# Altium PCB ZZ_KOM_ACB23_4009.PcbDoc (part 2 of 3)
Units mil, origin at the board's own origin, x right, y up, seen from the top; angles counter-clockwise.
Board outline 3937.01 x 2755.91 mil, 4 copper layers (Top Layer, Signal Layer 1, Signal Layer 2, Bottom Layer), stack 63.662 mil thick; 118 components, 212 nets, 909 pads, 347 vias.
Unrouted connection lines stored in the file: 40.
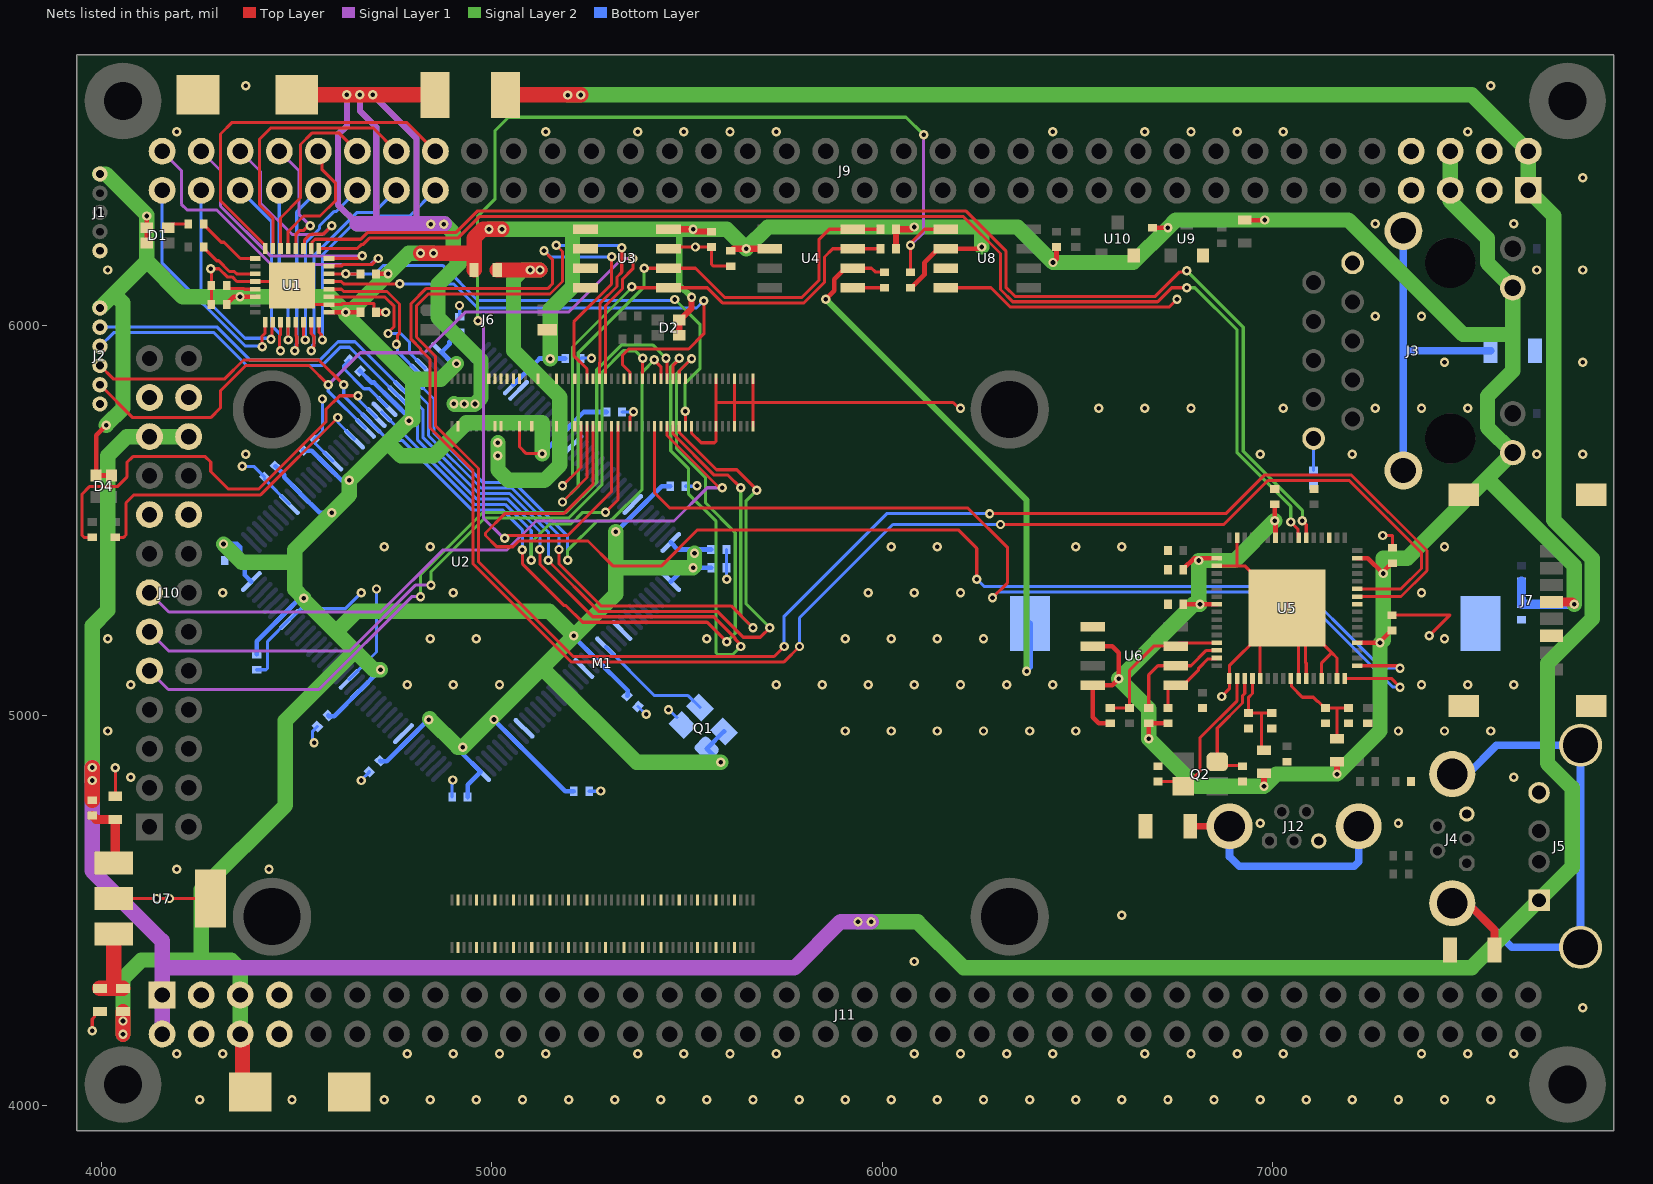
[diagram p4: the nets of this part, all layers, seen from the top]

## Via types
v1: diameter 24.02, hole 11.81, Top Layer to Bottom Layer, tented both sides, 347 vias

## Nets (pads, with @x,y where several pads share a name; then routed paths per layer and width w, separated by ;. In a path a pad name is that pad's centre, name@x,y a point inside that pad or via, vN(x,y) a via of type N, cw(c..) or ccw(c..) an arc to the next point about the centre after c; other vN are vias at no path point) (continued)
+3.3V: C2.2 C3.2 C4.2 C5.2 C6.2 C7.2 C9.2 C10.2 C11.2 C12.2 C14.2 C15.2 C16.2 C17.2 C19.2 C20.2 C21.2 C22.2 C28.2 C29.2 C30.2 C41.2 C42.2 C43.2 C44.2 C45.2 C50.1 D1.1 D1.2 D2.1 D2.2 D3.1 D4.1 D4.2 J1.1 J2.1 J3.11 J3.13 J7.4 J9.5 J9.6 J11.5 J11.6 L1.2 L2.2 L4.2 L5.2 M1.78 Q1.1 Q1.4 R1.2 R11.1 R12.1 R13.1 R14.1 R15.2 R16.2 R17.2 R24.2 R25.1 U1.9 U1.30 U2.7 U2.16 U2.30 U2.36 U2.37 U2.51 U2.66 U2.72 U2.79 U2.88 U2.102 U2.108 U2.118 U2.123 U2.135 U2.144 U3.8 U4.2 U5.20 U5.31 U5.42 U5.50 U5.56 U6.6 U6.8 U8.2 | length 20861
  Top Layer w7.87: M1.78@5070.87,5741.73 5070.87,5688.98 5088.6,5671.24 v1(5129.07,5671.24)
  Top Layer w11.81: v1(4011.81,5744.09) 3986.22,5718.5 D4.2@3986.22,5615.34 D4.1@4025.59,5615.34 ; D1.2@4116.14,6210.63 D1.1@4116.14,6250 v1(4116.14,6280) ; C2.2@4320.87,6053.15 4320.87,6055.12 4338.58,6072.83 v1(4355,6072.83) U1.30@4393.7,6072.83 ; U1.9@4582.68,6033.46 v1(4625.98,6033.46) C3.2@4663.78,6033.46 ; R1.2@4703.15,6131.89 v1(4734.25,6131.89) ; R14.1@6072.83,6096.26 6074.8,6096.26 6108.46,6129.92 6108.46,6160.83 6143.9,6196.26 U8.2@6163.39,6196.26 6247.68,6196.26 6252.21,6200.79 v1(6255.51,6200.79) ; v1(6437.91,6161.09) 6439.05,6161.09 6446.85,6168.89 R25.1@6446.85,6200.79 ; U6.6@6539.37,5177.95 6589.46,5177.95 6606.3,5161.12 v1(6606.3,5094.49) 6589.76,5077.95 U6.8@6539.37,5077.95 6539.37,4996.06 6555.12,4980.32 R17.2@6584.65,4980.32 ; v1(6683.07,4940.94) R16.2@6683.07,4980.32 R15.2@6732.28,4980.32 ; R24.2@6692.91,6250 v1(6732.28,6250) ; C44.2@6771.65,5285.43 v1(6814.47,5285.43) U5.56@6857.28,5285.43 ; C45.2@6771.65,5374.02 6771.65,5375.98 6799.21,5403.54 v1@6811.02,5403.54 ; v1(6811.02,5397.44) v1@6811.02,5403.54 ; U5.50@6857.28,5403.54 v1@6811.02,5403.54 ; D3.1@6929.13,6269.69 6979.69,6269.69 v1(6980,6270) ; v1(7005.91,5499.43) C41.2@7005.91,5541.34 ; U5.42@7007.87,5455.71 v1@7007.87,5499.51 ; U5.20@7217.52,5187.01 v1(7275.59,5187.01) 7275.59,5189.48 7304.32,5218.21 C43.2@7306.29,5218.21 ; U5.31@7217.52,5403.54 7244.09,5403.54 v1(7283.46,5364.17) 7285.8,5366.51 7285.8,5371.27 7305.31,5390.78 C42.2@7307.27,5390.78
  Top Layer w15.75: U3.8@5452.76,6246.26 v1(5515.65,6246.26) 5521.75,6240.16 C29.2@5562.99,6240.16 ; D2.1@5480.32,5974.41 D2.2@5480.32,6013.78 5482.28,6013.78 5511.81,6043.31 v1(5511.81,6071.55) ; C28.2@5612.2,6190.94 5614.17,6190.94 5619.49,6196.26 v1(5651.57,6196.26) U4.2@5712.6,6196.26 ; R13.1@6035.43,6196.26 R12.1@6035.43,6246.26 6074.73,6246.26 6080.44,6251.97 v1(6082.68,6251.97) ; v1(6978.35,4818.9) L2.2@6978.35,4852.36 ; v1(7165.35,4850.39) L1.2@7165.35,4881.89
  Top Layer w23.62: J7.4@7714.57,5291.34 7767.52,5291.34 7773.42,5285.43 v1(7773.53,5285.43)
  Top Layer w39.37: v1(4055.12,4184.25) L4.2@4055.12,4242.13 ; J11.6@4355.51,4184.25 4361.16,4178.6 4361.16,4055.37 C50.1@4381.1,4035.43 ; v1(4817.3,6185.04) 4952.15,6185.04 4954.72,6182.46 ; L5.2@4954.72,6141.73 4954.72,6182.46 ; v1(5026.17,6246.26) 4977.79,6246.26 4954.72,6223.2 4954.72,6182.46
  Signal Layer 2 w15.75: 5480.31,6246.26 5480.31,6103.05 v1(5511.81,6071.55)
  Signal Layer 2 w39.37: J2.1@3996.06,6044.61 4032.06,6080.61 ; J1.1@3996.06,6387.8 4011.01,6387.8 4116.14,6282.67 v1(4116.14,6280) 4116.14,6164.69 ; v1(4011.81,5744.09) 4055.12,5787.4 4055.12,6057.56 4032.06,6080.61 ; v1(4055.12,4184.25) 4055.12,4326.77 4102.36,4374.02 4255.51,4374.02 ; v1(4312.72,5439.87) 4359.7,5392.89 4495.33,5392.89 ; J11.6@4355.51,4184.25 J11.5@4355.51,4284.25 4355.51,4350.95 4332.45,4374.02 4255.51,4374.02 ; v1@4516.7,5299.3 4601.04,5214.96 ; v1(4518.16,5300.77) 4495.33,5323.6 4495.33,5392.89 ; v1(4714.95,5117.54) 4698.46,5117.54 4649.75,5166.25 ; v1(4787.98,5755.43) 4790.03,5757.5 4797.14,5757.5 4797.14,5856.92 4792.58,5861.48 ; v1(4787.98,5755.43) 4760.4,5727.85 4732.8,5700.27 ; v1@4840.68,4991.81 4913.13,4919.36 v1(4926,4919.36) 5129.02,5122.38 ; v1(4850.71,6185.04) 4787.4,6185.04 v1(4734.25,6131.89) 4635.83,6033.46 v1(4625.98,6033.46) ; v1(4909.62,5902.09) 4869.02,5861.48 4792.58,5861.48 ; v1(4992.76,6246.26) v1(5026.17,6246.26) 5206.69,6246.26 ; v1(5129.07,5671.24) 5129.07,5750.04 4934.98,5750.04 4850.71,5665.77 4767.3,5665.77 4732.8,5700.27 ; v1(5149.44,5914.53) 5149.44,6041.18 5206.69,6098.43 5206.69,6246.26 ; v1(5317.72,5471.65) 5317.72,5378.99 ; v1(5519.31,5416.18) 5519.31,5382.65 v1(5515.65,5378.99) 5317.72,5378.99 ; v1(5586.14,4880.72) 5370.68,4880.72 5129.02,5122.38 ; v1(6255.51,6200.79) 6255.51,6251.97 ; v1(7005.91,5499.43) 6903.92,5397.44 v1(6811.02,5397.44) 6811.02,5288.88 v1(6814.47,5285.43) 6797.24,5285.43 v1(6606.3,5094.49) 6683.07,5017.72 v1(6683.07,4940.94) 6805.12,4818.9 v1(6978.35,4818.9) 7009.84,4850.39 v1(7165.35,4850.39) 7275.59,4960.63 7275.59,5185.04 7283.46,5192.91 v1(7283.46,5364.17) 7283.46,5403.54 7345.47,5403.54 7549.7,5607.78 ; J9.6@7455.51,6446.06 J9.5@7455.51,6346.06 7455.51,6318.49 7551,6223 7551,6160.04 7614.78,6096.26 J3.13@7615.75,6096.26 7615.75,5976.38 ; v1(7773.53,5285.43) 7773.53,5383.95 7549.7,5607.78 ; 4032.06,6080.61 4116.14,6164.69 ; 4116.14,6164.69 4208,6072.83 v1(4355,6072.83) 4586.61,6072.83 v1(4625.98,6033.46) ; 4255.51,4374.02 4255.51,4554.72 4471,4770.21 4471,4987.5 4649.75,5166.25 ; 4495.33,5392.89 4495.33,5425.29 v1(4589.57,5519.54) 4635.22,5565.18 v1(4635.22,5602.68) 4732.8,5700.27 ; 4601.04,5214.96 4653.35,5267.28 5147.42,5267.28 v1(5210.3,5204.4) v1@5210.66,5204.03 ; 4601.04,5214.96 4649.75,5166.25 ; v1(4625.98,6033.46) 4625.98,6028.08 4792.58,5861.48 ; 5129.02,5122.38 v1@5210.66,5204.03 ; 5206.69,6246.26 5480.31,6246.26 v1(5515.65,6246.26) 5601.57,6246.26 v1(5651.57,6196.26) 5707.28,6251.97 v1(6082.68,6251.97) 6255.51,6251.97 ; v1@5210.66,5204.03 5317.72,5311.08 5317.72,5378.99 ; 6255.51,6251.97 6347.03,6251.97 v1(6437.91,6161.09) 6643.37,6161.09 v1(6732.28,6250) 6752.28,6270 v1(6980,6270) 7194.57,6270 7488.19,5976.38 7615.75,5976.38 ; 7549.7,5607.78 J3.11@7615.75,5673.82 7551,5738.57 7551,5819 7615.75,5883.75 7615.75,5976.38
  Bottom Layer w11.81: v1(4312.72,5439.87) 4347.91,5439.87 4354.83,5432.95 C10.2@4354.83,5397.72 4354.83,5395.75 4358.77,5391.81 4360.35,5391.81 4367.27,5384.89 4367.27,5360.29 U2.108@4383.97,5343.59 ; C11.2@4397.89,5156.91 4397.89,5190.48 U2.102@4467.49,5260.07 4505.84,5298.43 4515.83,5298.43 v1(4518.16,5300.77) ; C17.2@4445.97,5638.77 4467.86,5616.88 4467.86,5610.47 U2.118@4509.24,5569.09 4558.8,5519.54 v1(4589.57,5519.54) ; C16.2@4517.16,5680.49 4518.55,5679.09 4538.43,5679.09 U2.123@4578.84,5638.68 4614.84,5602.68 v1(4635.22,5602.68) ; C12.2@4581.15,5000.38 4582.55,4998.99 4596.15,4998.99 U2.88@4662.36,5065.2 4714.7,5117.54 v1(4714.95,5117.54) v1@4715.2,5117.54 ; C9.2@4662.36,5883.06 4691.98,5853.43 4698.16,5853.43 U2.135@4745.88,5805.72 4785.64,5765.95 4785.64,5757.77 v1(4787.98,5755.43) ; C4.2@4713.81,4884.25 4715.2,4882.86 4730.56,4882.86 U2.79@4787.63,4939.93 4837.16,4989.45 v1(4838.31,4989.45) ; v1(4909.62,5902.09) 4907.29,5904.42 4897.72,5904.42 U2.144@4871.15,5930.99 4891.62,5951.46 4891.62,5957.91 4916.03,5982.31 C15.2@4918,5982.31 ; v1(4926,4919.36) 4926,4901.78 U2.72@4971.37,4856.41 4937.93,4822.97 C7.2@4937.93,4791.59 ; v1@5005.04,4989.45 5005.36,4989.45 U2.66@5054.89,4939.93 5188.56,4806.25 C6.2@5210.21,4806.25 ; U2.7@5054.89,5847.47 5122.37,5914.96 C22.2@5188.22,5914.96 ; v1(5129.07,5671.24) 5129.21,5671.24 U2.16@5180.16,5722.2 5235.84,5777.88 C14.2@5294.3,5777.88 ; v1(5210.3,5204.4) 5210.3,5202.1 U2.51@5263.68,5148.72 5347.98,5064.42 5347.98,5052.67 C5.2@5346.58,5051.28 ; v1@5319.36,5471.65 U2.30@5375.03,5527.33 5435.49,5587.78 C20.2@5457.11,5587.78 ; U2.37@5458.55,5343.59 5493.95,5378.99 v1(5515.65,5378.99) C21.2@5562.14,5378.99 ; U2.36@5458.55,5443.81 5476.79,5425.57 v1@5519.31,5425.57 ; v1(5519.31,5416.18) v1@5519.31,5425.57 ; C19.2@5561.83,5425.57 v1@5519.31,5425.57 ; v1(5586.14,4880.72) 5585.39,4880.72 5551.1,4915.01 Q1.1@5550.35,4915.01 Q1.4@5594.89,4959.55
  Bottom Layer w23.62: R11.1@7637.8,5344.49 C30.2@7637.8,5285.43 v1(7773.53,5285.43)
  other v1: 4055.12,4217.66 5005.58,4990.12
+3.3V_CM: L5.1 M1.84 M1.86 | length 968.4
  Top Layer w39.37: L5.1@5013.78,6141.73 v1(5123.53,6141.73)
  Signal Layer 2 w39.37: v1(5015.75,5699.18) v1(5015.75,5665.77) 5015.75,5629.92 5042.99,5602.68 5134.66,5602.68 5174.44,5642.46 5174.44,5816.11 5055.51,5935.04 5055.51,6118.5 5078.74,6141.73 v1(5123.53,6141.73)
  other v1: 5098.48,6141.73
+3.3V_PHY: C46.2 C47.2 L2.1 U5.4 | length 250
  Top Layer w7.87: U5.4@6948.82,5095.47 6948.82,5057.01 6938.98,5047.17 C46.2@6938.98,5006.61 6971.48,5006.61 ; L2.1@6978.35,4911.42 6971.48,4918.28 6971.48,5006.61 ; C47.2@6998.03,5006.61 6971.48,5006.61
+3.3V_PLL: C48.2 C49.2 L1.1 U5.9 | length 269.2
  Top Layer w7.87: U5.9@7047.24,5095.47 7049.21,5093.5 7049.21,5074.73 7076.77,5047.17 7104.7,5047.17 7115.14,5036.73 7116.82,5036.73 7133.86,5019.69 7164.37,5019.69 ; L1.1@7165.35,4940.94 7165.35,5018.7 7164.37,5019.69 ; C49.2@7194.88,5019.69 7164.37,5019.69
+5.0V: J5.1 J9.1 J9.2 J10.21 J10.22 J11.1 J11.2 L3.1 R20.2 | length 10467.2
  Top Layer w39.37: R20.2@3976.38,4783.46 v1(3976.38,4833.89) v1(3976.38,4867.3) ; L3.1@5035.43,6590.55 v1@5228.35,6590.55
  Signal Layer 1 w39.37: v1(3976.38,4867.3) 3976.38,4602.36 4155.51,4423.23 4155.51,4353.74 ; J11.2@4155.51,4184.25 J11.1@4155.51,4284.25 4155.51,4353.74 ; v1@5972.44,4472.44 5893.7,4472.44 5775,4353.74 4155.51,4353.74
  Signal Layer 2 w39.37: v1(3976.38,4833.89) 3976.38,5230.15 4015.75,5269.52 4015.75,5665.77 4064.94,5714.96 J10.21@4123.22,5714.96 J10.22@4223.22,5714.96 ; v1@5194.2,6590.55 5227.6,6590.55 7511.02,6590.55 7645.87,6455.71 7652.56,6455.71 7655.51,6458.66 J9.2@7655.51,6446.06 J9.1@7655.51,6346.06 7720.47,6281.1 7720.47,5501.17 7818.9,5402.75 7818.9,5248.03 7704.72,5133.86 7704.72,4877.95 7767.72,4814.96 7767.72,4611.82 J5.1@7683.07,4527.17 7510.23,4354.33 6208.66,4354.33 6091.12,4471.88 v1(5938.29,4471.88)
  other v1: 5971.7,4471.88 5194.2,6589.99 5227.6,6589.99
+5.0V_CM: C31.1 L3.2 M1.77 M1.79 M1.81 M1.83 M1.85 M1.87 | length 3578.8
  Top Layer w39.37: C31.1@4500.79,6590.55 v1(4695.45,6590.55) L3.2@4854.33,6590.55
  Signal Layer 1 w15.75: v1(4628.64,6590.55) 4628.64,6510.53 4605.81,6487.7 4605.81,6309.55 4655.51,6259.84 ; v1(4662.04,6590.55) 4662.04,6549.15 4703.83,6507.36 4703.83,6264.67 ; v1(4695.45,6590.55) 4807.09,6478.91 4807.09,6259.84
  Signal Layer 1 w39.37: 4655.51,6259.84 4807.09,6259.84 v1@4877.95,6259.84
  Signal Layer 2 w15.75: v1(4628.64,6590.55) 4628.64,6510.53 4605.81,6487.7 4605.81,6309.55 4655.51,6259.84 ; v1(4662.04,6590.55) 4662.04,6549.15 4703.83,6507.36 4703.83,6264.67 4708.66,6259.84 ; v1(4695.45,6590.55) 4807.09,6478.91 4807.09,6259.84
  Signal Layer 2 w39.37: 4655.51,6259.84 4708.66,6259.84 4807.09,6259.84 4843.8,6259.84 4878.51,6259.84 4901.57,6236.78 4901.57,6180.47 4919.64,6162.41 4862.2,6104.97 4862.2,6020.39 4972.44,5910.15 4972.44,5814.33 v1@4955.4,5797.29 ; v1(4903.03,5798.79) 4904.53,5797.29 4929.13,5797.29 4955.68,5797.29 v1(4956.94,5798.55)
  other v1: 4929.13,5798.55 4843.8,6259.28 4877.21,6259.28
+VCore: C1.2 U1.29 | length 77.9
  Top Layer w7.87: C1.2@4320.87,6102.36 4320.87,6100.69 4326.77,6094.78 4364.09,6094.78 4366.35,6092.52 U1.29@4393.7,6092.52
Board_Reset: M1.48 R14.2 U8.1 | length 3201.9
  Top Layer w7.87: v1(5033.33,5454.66) 5033.33,5457.03 5037.95,5461.64 5194.28,5461.64 5307.09,5574.44 M1.48@5307.09,5741.73 ; R14.2@6072.83,6135.63 v1(6072.83,6204.72) 6072.83,6210.63 6108.46,6246.26 U8.1@6163.39,6246.26
  Signal Layer 1 w7.87: v1(4964.76,6011.81) 4978.88,5997.69 4978.88,5506.06 5030.28,5454.66 v1(5033.33,5454.66) ; v1(6072.83,6204.72) 6106.3,6238.19 v1(6106.3,6488.19)
  Signal Layer 2 w7.87: v1@4956.94,6011.81 v1(4964.76,6011.81) 4963.14,6013.44 4963.14,6277.9 5007.87,6322.64 5007.87,6498.07 5042.99,6533.18 6061.31,6533.18 v1(6106.3,6488.19)
ClockFPGA: Q1.3 U2.49 | length 306.6
  Bottom Layer w8: U2.49@5291.52,5176.56 5416.79,5051.28 5503.16,5051.28 Q1.3@5533.64,5020.8
CM_GPIO00: J10.13 M1.30 | length 1841.2
  Top Layer w7.87: M1.30@5448.82,5741.73 5448.82,5717.79 5579.7,5586.9 5587.63,5586.9 v1(5590.71,5583.82)
  Signal Layer 1 w7.87: J10.13@4123.22,5314.96 4172.78,5265.4 4715.83,5265.4 4875.33,5424.9 5039.07,5424.9 5113.06,5498.89 5217.15,5498.89 5467.01,5498.89 5551.94,5583.82 v1(5590.71,5583.82)
CM_GPIO01: J10.11 M1.37 | length 1853.4
  Top Layer w7.87: M1.37@5385.83,5862.99 5385.83,5914.66 v1(5386.84,5915.68)
  Signal Layer 1 w7.87: J10.11@4123.22,5214.96 4173,5165.18 4635.23,5165.18 4804.28,5334.23 v1(4844.22,5334.23)
  Signal Layer 2 w7.87: v1(4844.22,5334.23) 4843.8,5334.65 4843.8,5368.01 4982.35,5506.56 5197.11,5506.56 5282.84,5592.29 5282.84,5880.61 5337.19,5934.96 5367.56,5934.96 v1(5386.84,5915.68)
CM_GPIO02: J10.9 M1.29 | length 1991.4
  Top Layer w7.87: J10.9@4123.22,5114.96 J10.9@4132.26,5105.93 ; v1(5446.2,5916.04) 5448.82,5913.42 M1.29@5448.82,5862.99
  Signal Layer 1 w7.87: J10.9@4123.22,5114.96 4171.26,5066.93 4556.6,5066.93 4794.64,5304.97 v1(4817.3,5304.97)
  Signal Layer 2 w7.87: v1(4817.3,5304.97) 4817.3,5361.13 4976.61,5520.43 5191.36,5520.43 5268.97,5598.04 5268.97,5886.36 5332.58,5949.97 5412.27,5949.97 v1(5446.2,5916.04)
CM_RX_FPGA: M1.28 U2.138 | length 1851.2
  Top Layer w7.87: v1(5172.22,5425.57) 5172.22,5388.89 5279.9,5281.21 5613.35,5281.21 v1(5669.29,5225.28) ; M1.28@5464.57,5741.73 5464.57,5721.66 5569.99,5616.24 5605.37,5616.24 v1(5637.8,5583.82)
  Signal Layer 2 w7.87: v1(5637.8,5583.82) 5637.8,5256.77 v1(5669.29,5225.28)
  Bottom Layer w7.87: U2.138@4787.63,5847.47 4837.93,5797.18 4837.93,5717.51 4972.2,5583.23 5051.48,5583.23 5172.22,5462.49 v1(5172.22,5425.57)
CM_RX_FTDI: M1.34 U5.16 | length 2580.3
  Top Layer w7.87: M1.34@5417.32,5741.73 5417.32,5570.67 5456.5,5531.5 6220.22,5531.5 6321.57,5430.15 6321.57,5340.68 v1(6282.73,5301.83) ; U5.16@7185.04,5095.47 7304.33,5095.47 v1(7326.77,5073.04)
  Bottom Layer w7.87: v1(6282.73,5301.83) 6297.92,5317.02 7064.87,5317.02 7228.35,5153.54 7308.84,5073.05 v1(7326.77,5073.04)
CM_TX_FPGA: M1.31 U2.139 | length 1354.2
  Top Layer w7.87: v1(5416.55,5911.39) 5416.55,5910.67 5433.03,5894.19 5433.03,5888.62 ; M1.31@5433.07,5862.99 5433.07,5888.58 ; 5433.03,5888.62 5433.07,5888.58
  Signal Layer 2 w7.87: v1(5194.43,5397.72) 5194.43,5423.43 5269.88,5498.89 5303.07,5498.89 5307.18,5503 5308.82,5503 5385.3,5579.48 5385.3,5880.14 v1(5416.55,5911.39)
  Bottom Layer w7.87: U2.139@4801.55,5861.39 4851.8,5811.15 4851.8,5723.26 4977.95,5597.11 5057.22,5597.11 5194.43,5459.9 v1(5194.43,5397.72)
CM_TX_FTDI: M1.54 U5.17 | length 3213.1
  Top Layer w7.87: M1.54@5259.84,5741.73 5259.84,5593.34 5184.12,5517.62 5033.33,5517.62 4983.87,5468.16 4983.87,5461.64 5012.8,5432.72 5054.51,5432.72 5069.3,5447.51 5246.37,5447.51 5310.03,5383.86 5435.04,5383.86 5527.18,5476 6195.11,5476 6242.5,5428.61 v1(6242.5,5349.73) ; U5.17@7217.52,5127.95 7320.47,5127.95 v1(7326.77,5121.65)
  Bottom Layer w7.87: v1(6242.5,5349.73) 6261.34,5330.9 7070.61,5330.9 7234.09,5167.42 7279.86,5121.65 v1(7326.77,5121.65)
Con_RX_FTDI: M1.51 U5.26 | length 4855.6
  Top Layer w7.87: v1(5165.35,6204.72) 5181.1,6188.98 5181.1,6112.2 5149.01,6080.11 4836.93,6080.11 4807.19,6050.38 4807.19,5969.7 4855.51,5921.38 4855.51,5743.54 4966.02,5633.03 4966.02,5394.35 5208.7,5151.67 5723.42,5151.67 v1(5748.92,5177.17) ; M1.51@5275.59,5862.99 5275.59,5903.53 5277.4,5905.34 5277.4,6056.33 5320.77,6099.7 5320.77,6124.03 5332.98,6136.24 v1(5332.98,6198.82) ; v1(6275.29,5517.62) 6880.62,5517.62 6979.24,5616.24 7202.6,5616.24 7395.76,5423.07 7395.76,5371.42 7329.46,5305.12 U5.26@7217.52,5305.12
  Bottom Layer w7.87: v1(5165.35,6204.72) 5322.7,6204.72 5328.61,6198.82 v1(5332.98,6198.82) ; v1(5748.92,5177.17) 5748.92,5254.83 6011.72,5517.62 v1(6275.29,5517.62)
Con_TX_FTDI: M1.55 U5.27 | length 4827.4
  Top Layer w7.87: v1(5133.86,6190.94) 5155.25,6169.56 5155.25,6105.97 5143.26,6093.99 4831.18,6093.99 4793.31,6056.12 4793.31,5963.96 4817.3,5939.97 4817.3,5937.3 4841.64,5912.96 4841.64,5737.79 4952.15,5627.28 4952.15,5388.6 5202.96,5137.8 5748.92,5137.8 v1(5788.29,5177.17) ; M1.55@5244.09,5862.99 5244.09,5888.58 5210.3,5922.38 5210.3,6008.84 5306.9,6105.44 v1(5306.9,6175.29) ; v1(6303.23,5489.67) 6875.49,5489.67 6988.19,5602.36 7196.85,5602.36 7381.89,5417.32 7381.89,5377.17 7329.53,5324.8 U5.27@7217.52,5324.8
  Bottom Layer w7.87: v1(5133.86,6190.94) 5136.24,6190.94 5151.89,6175.29 v1(5306.9,6175.29) ; v1(5788.29,5177.17) 5788.29,5250.5 6027.46,5489.67 v1(6303.23,5489.67)
FPGA_LED_Green: R28.1 U2.128 | length 819.2
  Top Layer w7.87: R28.1@4035.43,5456.74 4056.76,5456.74 4062.83,5462.81 4062.83,5545.11 4083.56,5565.85 4407.7,5565.85 v1(4605.81,5763.96)
  Bottom Layer w7.87: v1(4605.81,5763.96) 4605.81,5750.91 U2.128@4648.44,5708.28
FPGA_LED_Red: R27.1 U2.132 | length 1144
  Top Layer w7.87: R27.1@3976.38,5456.74 3955.13,5456.74 3950.51,5461.35 3950.51,5568.1 3969.04,5586.62 4040.45,5586.62 4065,5611.17 4065,5648.38 4080.3,5663.68 4266.19,5663.68 4280,5649.88 4280,5625.38 4324.64,5580.74 4402.97,5580.74 4574.73,5752.5 4574.73,5784.25 4610.11,5819.64 v1(4657.19,5819.64)
  Bottom Layer w7.87: v1(4657.19,5819.64) 4657.19,5810.88 U2.132@4704.12,5763.96
FPGA_State: M1.46 U2.133 | length 1091.9
  Top Layer w7.87: v1(5291.34,5520.83) 5322.83,5552.33 M1.46@5322.83,5741.73
  Top Layer w8: v1@5101.09,5393.38 v1(5101.09,5397.72)
  Signal Layer 2 w8: v1(5101.09,5397.72) 5101.09,5443.73 5148.57,5491.2 5202.97,5491.2 5232.6,5520.83 v1(5291.34,5520.83)
  Bottom Layer w8: U2.133@4718.04,5777.88 4954.62,5541.3 5034.1,5541.3 5101.09,5474.31 v1(5101.09,5397.72)
FPGA_TCK: J2.4 M1.25 U2.131 | length 2883.6
  Top Layer w8: J2.4@3996.06,5896.97 4030.05,5862.99 4315.75,5862.99 4363.87,5911.11 4556.97,5911.11 v1(4620.6,5847.47) ; v1(5078.24,5425.41) 5078.24,5389.45 5185.68,5282.01 5190.1,5282.01 5232.83,5239.28 5348.93,5239.28 5551.55,5239.28 v1(5601.85,5188.98) ; M1.25@5480.31,5862.99 5480.38,5863.06 5480.38,5883.09 v1(5511.81,5914.53)
  Signal Layer 2 w8: v1(5511.81,5914.53) 5473.27,5875.98 5473.27,5684.05 5547.74,5609.57 5547.74,5544.69 5623.86,5468.57 5623.86,5210.98 v1(5601.85,5188.98)
  Bottom Layer w8: v1(4620.6,5847.47) 4620.6,5819.64 U2.131@4690.2,5750.04 4734.87,5705.36 4770.75,5705.36 4948.82,5527.3 5027.05,5527.3 5078.24,5476.1 v1(5078.24,5425.41)
FPGA_TDI: J2.3 M1.27 U2.136 | length 3064.3
  Top Layer w8: v1(5123.1,5425.57) 5123.1,5388.6 5258.43,5253.28 5568.68,5253.28 5623.86,5198.09 5623.86,5195.44 5637.8,5181.5 v1(5637.8,5177.17) ; M1.27@5464.57,5862.99 5464.57,5897.62 5480.31,5913.37 v1(5480.31,5915.82)
  Signal Layer 2 w8: v1(5480.31,5915.82) 5458.52,5894.03 5458.52,5678.6 5503.67,5633.45 5503.67,5568.96 5574.8,5497.83 5574.8,5160.69 5579.49,5156 5616.63,5156 v1(5637.8,5177.17)
  Bottom Layer w8: J2.3@3996.06,5946.19 4031.28,5981.4 4288.31,5981.4 4372.81,5896.89 4564.59,5896.89 4611.61,5943.91 4635.52,5943.91 U2.136@4759.79,5819.64 4809.99,5769.44 4809.99,5705.94 4960.63,5555.3 5039.9,5555.3 5123.53,5471.67 5123.53,5426 v1(5123.1,5425.57)
FPGA_TDO: J2.2 M1.26 U2.137 | length 2845.6
  Top Layer w8: v1(5145.11,5397.72) 5145.11,5396.29 5274.12,5267.28 5577.49,5267.28 5643.98,5200.79 5688.11,5200.79 v1(5712.6,5225.28) ; M1.26@5480.31,5741.73 5480.38,5741.67 5480.38,5725.56 5575.76,5630.17 5627.87,5630.17 5679.01,5579.03 v1(5679.01,5577.74)
  Signal Layer 2 w8: v1(5679.01,5577.74) 5651.74,5550.46 5651.74,5286.13 v1(5712.6,5225.28)
  Bottom Layer w8: J2.2@3996.06,5995.4 4296.73,5995.4 4381.24,5910.89 4558.8,5910.89 4605.81,5957.91 4649.36,5957.91 U2.137@4773.71,5833.55 4823.99,5783.28 4823.99,5711.74 4966.43,5569.3 5045.7,5569.3 5145.11,5469.89 v1(5145.11,5397.72)
FPGA_TMS: J2.5 M1.49 U2.130 | length 2123.7
  Top Layer w8: J2.5@3996.06,5847.76 4080.19,5763.63 4279.69,5763.63 4305,5788.94 4305,5832.45 4369.66,5897.11 4531.52,5897.11 v1(4581.15,5847.47) ; M1.49@5291.34,5862.99 5291.34,6050.55 5334.71,6093.92 5334.71,6118.26 5361.43,6144.98 v1(5361.43,6171.26)
  Signal Layer 1 w8: v1(4581.15,5847.47) 4663.33,5929.65 4827.46,5929.65 4931.63,6033.82 5196.55,6033.82 5333.99,6171.26 v1(5361.43,6171.26)
  Bottom Layer w8: v1(4581.15,5847.47) 4581.15,5831.24 U2.130@4676.28,5736.12
FT_EECLK: R16.1 U5.62 U6.2 | length 285.2
  Top Layer w7.87: R16.1@6683.07,5019.69 6683.07,5104.72 6706.31,5127.95 6791.34,5127.95 6830.71,5167.32 U5.62@6857.28,5167.32
FT_EECS: R15.1 U5.63 U6.1 | length 209.8
  Top Layer w7.87: R15.1@6732.28,5019.69 6732.28,5069.88 6740.35,5077.95 U6.1@6751.97,5077.95 6771.46,5077.95 6811.02,5117.52 6811.02,5121.65 6835.04,5145.67 6855.31,5145.67 U5.63@6857.28,5147.64
FT_EEDATA: R17.1 R18.1 U5.61 U6.3 | length 398.4
  Top Layer w7.87: R17.1@6584.65,5019.69 R18.1@6633.86,5019.69 6633.86,5116.14 6695.67,5177.95 U6.3@6751.97,5177.95 6760.04,5186.02 6856.3,5186.02 U5.61@6857.28,5187.01
GND: C1.1 C2.1 C3.1 C4.1 C5.1 C6.1 C7.1 C9.1 C10.1 C11.1 C12.1 C14.1 C15.1 C16.1 C17.1 C19.1 C20.1 C21.1 C22.1 C24.2 C25.1 C26.2 C27.1 C28.1 C29.1 C30.1 C31.2 C32.2 C33.1 C34.1 C35.1 C36.1 C37.1 C38.1 C39.1 C40.1 C41.1 C42.1 C43.1 C44.1 C45.1 C46.1 C47.1 C48.1 C49.1 C50.2 J1.5 J2.6 J3.10 J4.5 J5.4 J6.R2 J7.6 J7.Shield J8.- J9.3 J9.4 J9.7 J9.8 J10.17 J10.18 J10.23 J10.24 J11.3 J11.4 J11.7 J11.8 J12.5 M1.1 M1.2 M1.7 M1.8 M1.13 M1.14 M1.22 M1.23 M1.32 M1.33 M1.42 M1.43 M1.52 M1.53 M1.59 M1.60 M1.65 M1.66 M1.71 M1.74 M1.98 M1.107 M1.108 M1.113 M1.114 M1.119 M1.120 M1.125 M1.131 M1.132 M1.137 M1.138 M1.144 M1.150 M1.155 M1.156 M1.161 M1.162 M1.167 M1.168 M1.173 M1.174 M1.179 M1.180 M1.185 M1.186 M1.191 M1.192 M1.197 M1.198 Q1.2 R22.1 R23.1 U1.10 U1.28 U1.EP U2.8 U2.18 U2.29 U2.46 U2.53 U2.64 U2.80 U2.90 U2.101 U2.116 U2.124 U2.134 U3.1 U3.2 U3.3 U3.4 U3.7 U4.5 U5.1 U5.5 U5.10 U5.11 U5.13 U5.15 U5.25 U5.35 U5.47 U5.51 U5.EP U6.5 U7.2 U7.EP U8.3 U8.4 U9.2 U10.2 | length 6208.4
  Top Layer w7.87: v1(3976.38,4192.91) 3976.38,4222.44 3982.28,4228.35 3982.28,4234.25 3990.16,4242.13 C36.1@3996.06,4242.13 ; U7.2@4031.5,4531.5 U7.EP@4279.53,4531.5 ; C35.1@4035.43,4793.31 v1(4035.43,4866.48) ; C2.1@4281.5,6053.15 C1.1@4281.5,6102.36 4281.5,6143.5 v1(4280,6145) 4300.98,6145 4321.87,6124.11 4334.82,6124.11 4346.73,6112.2 U1.28@4393.7,6112.2 4478.35,6112.2 U1.EP@4488.19,6102.36 4537.4,6053.15 U1.10@4582.68,6053.15 4614.63,6053.15 4616.89,6055.41 4698.54,6055.41 4698.54,6038.08 C3.1@4703.15,6033.46 ; M1.42@5354.33,5741.73 5354.33,5766.67 5362.93,5775.27 v1(5362.93,5778.74) ; U3.7@5452.76,6196.26 5457.28,6200.79 v1(5521.75,6200.79) C29.1@5562.99,6200.79 5562.99,6156.19 5567.6,6151.57 C28.1@5612.2,6151.57 ; M1.22@5511.81,5741.73 5511.81,5723.8 5536.43,5699.18 5570.19,5699.18 5574.8,5703.79 5574.8,5802.36 ; M1.13@5574.8,5862.99 5574.8,5802.36 ; M1.8@5622.05,5741.73 5622.05,5802.36 ; M1.7@5622.05,5862.99 5622.05,5802.36 ; M1.2@5669.29,5741.73 5669.29,5802.36 ; M1.1@5669.29,5862.99 5669.29,5853.15 5669.29,5802.36 ; U4.5@5925.2,6096.26 C27.1@6005.91,6096.26 ; U8.4@6163.39,6096.26 6279.19,6096.26 6328.88,6046.57 6735.15,6046.57 v1(6755.51,6066.93) ; v1(6200.79,5787.4) 6197.03,5787.4 6182.06,5802.36 5669.29,5802.36 ; U5.51@6857.28,5383.86 6909.45,5383.86 ; v1(6870.08,5049.13) 6889.76,5068.82 6889.76,5127.95 U5.EP@6968.5,5206.69 ; U5.47@6909.45,5455.71 6909.45,5383.86 ; U5.5@6968.5,5095.47 U5.EP@6968.5,5206.69 ; U5.10@7066.93,5095.47 U5.EP@7066.93,5246.06 ; U5.11@7086.61,5095.47 7086.61,5134.32 7084.35,5136.58 U5.EP@7084.35,5228.64 ; U5.13@7125.98,5095.47 7125.98,5135.23 7151.87,5161.12 ; U5.15@7165.35,5095.47 7165.35,5147.64 7151.87,5161.12 ; v1(7282.2,5461.64) 7307.27,5461.64 C42.1@7307.27,5430.15 ; C43.1@7306.29,5257.58 7454.43,5257.58 v1(7401.57,5204.72) ; 5574.8,5802.36 5622.05,5802.36 ; 5622.05,5802.36 5669.29,5802.36 ; 6909.45,5383.86 6929.13,5383.86 U5.EP@7037.4,5275.59 ; U5.EP@6968.5,5206.69 U5.EP@7037.4,5275.59 ; U5.EP@7037.4,5275.59 U5.EP@7066.93,5246.06 ; U5.EP@7066.93,5246.06 U5.EP@7084.35,5228.64 ; U5.EP@7084.35,5228.64 7151.87,5161.12
  Top Layer w15.75: C3.1@4703.15,6033.46 v1(4727.96,6033.46)
  Bottom Layer w7.87: v1(4360.35,5638.77) 4390.29,5638.77 C17.1@4418.13,5610.93 ; C11.1@4397.89,5117.54 4421.12,5117.54 4425.73,5122.15 4425.73,5190.48 U2.101@4481.41,5246.15 4482.47,5246.15 4510.31,5273.99 4624.39,5273.99 v1(4665.35,5314.96) ; C17.1@4418.13,5605.59 U2.116@4481.41,5542.31 ; v1(4544.65,4930.78) 4544.65,4935.15 4541.19,4938.62 4541.19,4960.41 C12.1@4553.31,4972.54 ; 4551,5694.36 U2.124@4592.76,5652.6 ; 4551,5694.41 4545,5700.41 C16.1@4545,5708.33 4566.13,5729.45 v1(4566.13,5811.15) ; U2.90@4634.52,5093.04 4704.57,5163.09 v1(4704.57,5324.57) ; C9.1@4634.52,5910.89 4620.01,5896.39 4620.01,5889.86 4672.29,5837.59 4686.16,5837.59 U2.134@4731.96,5791.8 ; v1(4665.89,4833.89) 4665.89,4835.11 4685.97,4855.19 C4.1@4685.97,4856.41 ; C7.1@4898.56,4791.59 4898.56,4833.78 v1(4899.9,4835.11) ; C15.1@4918,6021.69 v1@4918,6050.08 ; C22.1@5227.59,5914.96 5228.46,5915.82 v1(5255.46,5915.82) ; C6.1@5249.67,4806.25 v1@5278.06,4806.25 ; C14.1@5333.67,5777.88 v1@5362.07,5777.88 ; C5.1@5374.42,5023.44 v1@5394.5,5003.37 ; v1@5453.88,5015.27 Q1.2@5473.96,4995.2 ; C20.1@5496.48,5587.78 v1@5524.87,5587.78 ; C19.1@5601.2,5425.57 5601.35,5425.41 5601.35,5379.14 5601.68,5378.82 5601.68,5349.91 v1(5601.85,5349.73)
  other v1: 4251.97,4015.75 4488.19,4015.75 4724.41,4015.75 4842.52,4015.75 4960.63,4015.75 5078.74,4015.75 5196.85,4015.75 5314.96,4015.75 5433.07,4015.75 5551.18,4015.75 5669.29,4015.75 5787.4,4015.75 5905.51,4015.75 6023.62,4015.75 6141.73,4015.75 6259.84,4015.75 6377.95,4015.75 6496.06,4015.75 6614.17,4015.75 6732.28,4015.75 6850.39,4015.75 6968.5,4015.75 7086.61,4015.75 7204.72,4015.75 7322.83,4015.75 7440.94,4015.75 7559.05,4015.75 4192.91,4133.86 4311.02,4133.86 4783.46,4133.86 4901.57,4133.86 5019.68,4133.86 5137.79,4133.86 5374.01,4133.86 5492.12,4133.86 5610.23,4133.86 5728.34,4133.86 6082.68,4133.86 6200.79,4133.86 6318.9,4133.86 6437.01,4133.86 6673.23,4133.86 6791.34,4133.86 6909.45,4133.86 7027.56,4133.86 7381.89,4133.86 7500,4133.86 7618.11,4133.86 7795.27,4251.97 6082.68,4370.08 6614.17,4488.19 4141,4531.5 4174.41,4531.5 4192.91,4606.3 4429.13,4606.3 6968.5,4724.41 7322.83,4724.41 5278.92,4807.12 4074.8,4842.52 7618.11,4842.52 4015.75,4960.63 5905.51,4960.63 6023.62,4960.63 6141.73,4960.63 6259.84,4960.63 6377.95,4960.63 6496.06,4960.63 7322.83,4960.63 7440.94,4960.63 7559.05,4960.63 5395.72,5003.37 5452.66,5015.27 4074.8,5078.74 4783.46,5078.74 4901.57,5078.74 5019.68,5078.74 5728.34,5078.74 5846.45,5078.74 5964.57,5078.74 6082.68,5078.74 6200.79,5078.74 6318.9,5078.74 6437.01,5078.74 7381.89,5078.74 7500,5078.74 7618.11,5078.74 4015.75,5196.85 4842.52,5196.85 4960.63,5196.85 5551.18,5196.85 5905.51,5196.85 6023.62,5196.85 6141.73,5196.85 6259.84,5196.85 7440.94,5196.85 4311.02,5314.96 4901.57,5314.96 5964.57,5314.96 6082.68,5314.96 6200.79,5314.96 7381.89,5314.96 4724.41,5433.07 4842.52,5433.07 6023.62,5433.07 6141.73,5433.07 6496.06,5433.07 6614.17,5433.07 7440.94,5433.07 5525.74,5588.64 4370.08,5669.29 6968.5,5669.29 7204.72,5669.29 7677.16,5669.29 7795.27,5669.29 6555.12,5787.4 6673.23,5787.4 6791.34,5787.4 7027.56,5787.4 7263.78,5787.4 7381.89,5787.4 7500,5787.4 7440.94,5905.51 7795.27,5905.51 7263.78,6023.62 7381.89,6023.62 4917.14,6050.94 4015.75,6141.73 7677.16,6141.73 7795.27,6141.73 7263.78,6259.84 7618.11,6259.84 7795.27,6377.95 4192.91,6496.06 5137.79,6496.06 5374.01,6496.06 5492.12,6496.06 5610.23,6496.06 5728.34,6496.06 6437.01,6496.06 6673.23,6496.06 6791.34,6496.06 6909.45,6496.06 7027.56,6496.06 7500,6496.06 4370.08,6614.17 7559.05,6614.17
I2C_SCL: M1.56 R12.2 U3.6 U4.8 | length 1676.4
  Top Layer w7.87: v1(5181.1,5547.28) 5244.09,5610.28 M1.56@5244.09,5741.73 ; v1(5390.42,6146.26) U3.6@5452.76,6146.26 5521.75,6146.26 5596.46,6071.55 5794.19,6071.55 5838.58,6115.94 5838.58,6220.47 5864.37,6246.26 U4.8@5925.2,6246.26 R12.2@5996.06,6246.26
  Signal Layer 2 w7.87: v1(5181.1,5547.28) 5221.42,5587.6 5221.42,5930.08 5390.42,6099.08 v1(5390.42,6146.26)
I2C_SDA: M1.58 R13.2 U3.5 U4.7 | length 1506
  Top Layer w7.87: v1(5181.1,5588.64) 5228.35,5635.89 M1.58@5228.35,5741.73 ; v1(5359,6098.69) 5361.43,6096.26 5552.13,6096.26 5590.71,6057.68 5799.94,6057.68 5852.46,6110.2 5852.46,6175.29 5873.43,6196.26 U4.7@5925.2,6196.26 R13.2@5996.06,6196.26
  Signal Layer 2 w7.87: v1(5181.1,5588.64) 5206.69,5614.24 5206.69,5944.51 5359,6096.81 v1(5359,6098.69)
mC_Boot: M1.24 R1.1 U1.14 | length 1334.3
  Top Layer w7.87: U1.14@4582.68,6131.89 v1(4625.98,6131.89) R1.1@4663.78,6131.89 ; v1(5495.28,5779.53) 5496.06,5778.74 M1.24@5496.06,5741.73
  Signal Layer 2 w7.87: v1(5468.5,6066.24) 5469.19,6066.24 5533.76,6001.68 5533.76,5890.14 5495.28,5851.66 v1(5495.28,5779.53)
  Bottom Layer w7.87: v1(4625.98,6131.89) 4700.69,6131.89 4722.64,6153.83 4873.99,6153.83 4964.34,6063.48 v1@5464.42,6063.48
mC_GPIO_00: J9.71 U1.1 | length 597.6
  Top Layer w7.87: v1(4411.67,5945.03) 4411.67,5972.82 4419.29,5980.44 U1.1@4419.29,6007.87
  Bottom Layer w7.87: J9.71@4155.51,6346.06 4155.51,6159.45 4367.61,5947.35 4409.35,5947.35 v1(4411.67,5945.03)
mC_GPIO_01: J9.69 U1.2 | length 538.5
  Top Layer w7.87: v1(4434.46,5964.57) 4437.01,5967.12 4437.01,6005.91 U1.2@4438.98,6007.87
  Bottom Layer w7.87: J9.69@4255.51,6346.06 4255.51,6079.07 4367.61,5966.97 4432.05,5966.97 v1(4434.46,5964.57)
mC_GPIO_02: J9.67 U1.3 | length 528.5
  Top Layer w7.87: v1(4458.66,5935.04) 4456.4,5937.3 4456.4,5973.66 4458.66,5975.92 U1.3@4458.66,6007.87
  Bottom Layer w7.87: J9.67@4355.51,6346.06 4435.94,6265.64 4435.94,5998.64 4456.4,5978.18 4456.4,5937.3 v1(4458.66,5935.04)
mC_GPIO_03: J9.65 U1.4 | length 438.2
  Top Layer w7.87: v1(4478.35,5962.6) U1.4@4478.35,6007.87
  Bottom Layer w7.87: J9.65@4455.51,6346.06 4455.51,6159.68 4478.35,6136.84 v1(4478.35,5962.6)
mC_GPIO_04: J9.63 U1.5 | length 511.8
  Top Layer w7.87: v1(4495.33,5935.04) 4495.33,5939.41 4500.29,5944.37 4500.29,5971.69 4498.03,5973.95 U1.5@4498.03,6007.87
  Bottom Layer w7.87: v1(4495.33,5935.04) 4498.41,5938.13 4498.41,5951.63 4500.29,5953.51 4500.29,6290.84 J9.63@4555.51,6346.06
mC_GPIO_05: J9.61 U1.6 | length 489
  Top Layer w7.87: U1.6@4517.72,6007.87 4517.72,5967.12 v1(4522.24,5962.6)
  Bottom Layer w7.87: v1(4522.24,5962.6) 4522.24,6211.2 4558.81,6247.77 4558.81,6254.84 4595.38,6291.41 4600.86,6291.41 J9.61@4655.51,6346.06
mC_GPIO_06: J9.59 U1.7 | length 605.3
  Top Layer w7.87: v1(4537.4,5935.04) 4537.4,5939.41 4544.18,5946.19 4544.18,5972.38 4537.4,5979.16 U1.7@4537.4,6007.87
  Bottom Layer w7.87: v1(4537.4,5935.04) 4540.49,5938.13 4540.49,5949.82 4544.18,5953.51 4544.18,6178.15 4655.4,6289.37 4698.82,6289.37 J9.59@4755.51,6346.06
mC_GPIO_07: J9.57 U1.8 | length 624.9
  Top Layer w7.87: U1.8@4557.09,6007.87 4557.09,5982.28 4563.04,5976.33 4563.04,5965.69 v1(4566.13,5962.6)
  Bottom Layer w7.87: v1(4566.13,5962.6) 4566.13,6180.47 4661.15,6275.5 4704.57,6275.5 4708.6,6279.53 4788.98,6279.53 J9.57@4855.51,6346.06
mC_GPIO_08: J9.72 U1.15 | length 864.5
  Top Layer w7.87: U1.15@4582.68,6151.57 4614.63,6151.57 4619.25,6156.19 4693.96,6156.19 v1(4708.9,6171.13)
  Signal Layer 1 w7.87: J9.72@4155.51,6446.06 4204.72,6396.85 4204.72,6310.63 4219.35,6296 4294.62,6296 4434.43,6156.19 4690.15,6156.19 4705.09,6171.13 v1(4708.9,6171.13)
mC_GPIO_09: J9.70 U1.16 | length 664.6
  Top Layer w7.87: U1.16@4582.68,6171.26 4656.58,6171.26 4663.45,6178.13 v1(4667.65,6178.13)
  Signal Layer 1 w7.87: J9.70@4255.51,6446.06 4304.93,6396.64 4304.93,6305.3 4432.1,6178.13 v1(4667.65,6178.13) v1@4667.78,6178
mC_GPIO_10: J9.68 U1.19 | length 486.5
  Top Layer w7.87: U1.19@4517.72,6196.85 4519.68,6198.82 4519.68,6217.74 4535,6233.06 4539.93,6233.06 4541.32,6234.44 4569.44,6234.44 v1(4590,6255)
  Signal Layer 1 w7.87: J9.68@4355.51,6446.06 4407.61,6393.96 4407.61,6313.39 4487.95,6233.06 4568.06,6233.06 v1(4590,6255)
mC_GPIO_11: J9.66 U1.20 | length 306.4
  Top Layer w7.87: U1.20@4498.03,6196.85 4498.03,6233.67 4507.7,6243.34 4518.42,6243.34 4530.5,6255.42 v1(4534.87,6255.42)
  Signal Layer 1 w7.87: J9.66@4455.51,6446.06 4506.33,6395.25 4506.33,6283.67 4534.58,6255.42 v1(4534.87,6255.42)
mC_GPIO_12: J9.64 U1.21 | length 342.8
  Top Layer w7.87: U1.21@4478.35,6196.85 4478.35,6240.63 4517.72,6280 4560,6280 4600,6320 4600,6364.35 4564.54,6399.8 4564.54,6437.03 J9.64@4555.51,6446.06
mC_GPIO_13: J9.62 U1.22 | length 464.4
  Top Layer w7.87: U1.22@4458.66,6196.85 4458.66,6275.18 4510,6326.52 4510,6463.32 4538.93,6492.25 4609.32,6492.25 J9.62@4655.51,6446.06
mC_GPIO_14: J9.60 U1.23 | length 681.5
  Top Layer w7.87: U1.23@4438.98,6196.85 4438.98,6275.37 4405,6309.35 4405,6476.67 4434.46,6506.13 4695.45,6506.13 J9.60@4755.51,6446.06
mC_GPIO_15: J9.58 U1.24 | length 934.1
  Top Layer w7.87: U1.24@4419.29,6196.85 4419.29,6204.72 4305,6319.02 4305,6490 4335,6520 4781.57,6520 J9.58@4855.51,6446.06
mC_LEDG: R2.1 U1.25 | length 169.7
  Top Layer w7.87: R2.1@4261.81,6259.84 4261.81,6257.87 4306.8,6212.89 4314.09,6212.89 4355.72,6171.26 U1.25@4393.7,6171.26
mC_LEDR: R3.1 U1.27 | length 161.6
  Top Layer w7.87: R3.1@4261.81,6200.79 4261.81,6198.82 4295.18,6165.45 4300.15,6165.45 4327.62,6137.98 4340.57,6137.98 4346.67,6131.89 U1.27@4393.7,6131.89
mC_RX_FPGA: U1.12 U2.140 | length 404.2
  Top Layer w7.87: U1.12@4582.68,6092.52 4614.7,6092.52 4620.51,6086.71 4731.66,6086.71 4763.78,6054.59 4763.78,5979.41 4758.8,5974.43 4758.8,5954.75 v1(4755.71,5951.66)
  Bottom Layer w7.87: v1(4755.71,5951.66) 4758.8,5948.57 4758.8,5931.99 U2.140@4815.47,5875.31
mC_RX_FTDI: U1.18 U5.38 | length 3274.3
  Top Layer w7.87: U1.18@4537.4,6196.85 4539.37,6198.82 4539.37,6212.87 4547.07,6220.57 4663.87,6220.57 4680.64,6237.33 4907.35,6237.33 4962.48,6292.47 6215.41,6292.47 6317.11,6190.77 6317.11,6097.58 6340.37,6074.31 6700.17,6074.31 6762.82,6136.97 6777.42,6136.97 v1(6780.51,6140.06) ; v1(7076.77,5499.51) 7086.61,5489.67 U5.38@7086.61,5455.71
  Signal Layer 2 w7.87: v1(6780.51,6140.06) 6925.2,5995.37 6925.2,5677.49 7076.77,5525.92 v1(7076.77,5499.51)
mC_State: M1.41 U1.13 | length 1381
  Top Layer w7.87: U1.13@4582.68,6112.2 4614.63,6112.2 4620.54,6106.3 v1(4763.78,6106.3) ; M1.41@5354.33,5862.99 5354.33,5879.01 5334.71,5898.64 5334.71,5923.38 5350.6,5939.27 5504.23,5939.27 5543.31,5978.35 v1(5543.31,6062.99)
  Bottom Layer w7.87: v1(4763.78,6106.3) 4901.9,6106.3 4963.9,6044.3 5524.61,6044.3 v1(5543.31,6062.99)
mC_TX_FPGA: U1.11 U2.141 | length 401.5
  Top Layer w7.87: U1.11@4582.68,6072.83 4725.92,6072.83 4749.91,6048.85 4749.91,5997.19 4734.25,5981.54 v1(4734.25,5979.16)
  Bottom Layer w7.87: v1(4734.25,5979.16) 4766.44,5979.16 4788.98,5956.63 4788.98,5929.65 U2.141@4829.39,5889.23
mC_TX_FTDI: U1.17 U5.39 | length 3188.1
  Top Layer w7.87: U1.17@4557.09,6196.85 4655.33,6196.85 4665.17,6206.69 4669.62,6206.69 4686.39,6223.46 4913.09,6223.46 4968.23,6278.59 6208.74,6278.59 6303.23,6184.1 6303.23,6091.83 6334.63,6060.44 6705.91,6060.44 6741.73,6096.26 v1(6780.51,6096.26) ; v1(7046.96,5496.03) 7047.28,5496.03 7064.96,5478.35 7064.96,5457.68 U5.39@7066.93,5455.71
  Signal Layer 2 w7.87: v1(6780.51,6096.26) 6801.38,6096.26 6909.45,5988.19 6909.45,5673.62 7046.96,5536.11 v1(7046.96,5496.03)
NetC24_1: C24.1 J3.1 | length 81.9
  Bottom Layer w7.87: C24.1@7105.51,5628.15 J3.1@7105.51,5710.04
NetC25_2: C25.2 J3.S | length 837
  Bottom Layer w19.68: J3.S@7335.43,5628.15 7335.43,5935.04 ; J3.S@7335.43,6241.93 7335.43,5935.04 ; C25.2@7558.66,5935.04 7335.43,5935.04
NetC26_1: C26.1 J4.S J5.S | length 1323.1
  Top Layer w19.68: J4.S@7500,4519.69 7568.9,4450.79 C26.1@7568.9,4399.61
  Bottom Layer w19.68: J4.S@7500,4519.69 7613.39,4406.3 J5.S@7789.37,4406.3 J5.S@7789.37,4924.41 7574.02,4924.41 J4.S@7500,4850.39
NetC27_2: C27.2 J8.+ U4.6 | length 1496.2
  Top Layer w7.87: U4.6@5925.2,6146.26 5973.03,6146.26 5982.28,6137.01 6004.53,6137.01 C27.2@6005.91,6135.63
  Top Layer w11.81: v1(5855.51,6066.93) 5877.56,6088.98 5877.56,6118.11 5905.71,6146.26 U4.6@5925.2,6146.26
  Signal Layer 2 w15.75: v1(5855.51,6066.93) 6370.08,5552.36 v1(6370.08,5114.17)
  Bottom Layer w15.75: v1(6370.08,5114.17) 6370.08,5116.41 6378.54,5124.88 J8.+@6378.54,5236.22
NetC32_1: C32.1 J12.S | length 614.7
  Top Layer w15.75: C32.1@6789.37,4716.54 J12.S@6890.16,4716.54
  Bottom Layer w19.68: J12.S@6890.16,4716.54 6890.16,4638.84 6914.61,4614.39 7209.33,4614.39 7220.87,4625.92 J12.S@7220.87,4716.54
NetC33_2: C33.2 Q2.1 U5.3 | length 312.5
  Top Layer w7.87: C33.2@6923.62,4870.47 6921.85,4872.24 6868.31,4872.24 Q2.1@6858.66,4881.89 6858.66,4967.98 6923.32,5032.64 6923.32,5051.13 6929.13,5056.94 U5.3@6929.13,5095.47
NetC34_2: C34.2 Q2.3 U5.2 | length 388.6
  Top Layer w7.87: C34.2@6707.09,4831.1 Q2.3@6759.84,4831.1 ; Q2.3@6772.05,4818.9 6775.98,4818.9 6814.47,4857.38 6814.47,4943.41 6909.45,5038.39 U5.2@6909.45,5095.47
NetC35_2: C35.2 R20.1 U7.1 | length 177
  Top Layer w23.62: R20.1@3976.38,4744.09 3986.22,4734.25 C35.2@4035.43,4734.25 4035.43,4625.98 U7.1@4031.5,4622.05
NetC36_2: C36.2 L4.1 U7.3 | length 198.8
  Top Layer w39.37: C36.2@3996.06,4301.18 4031.5,4301.18 ; U7.3@4031.5,4440.94 4031.5,4301.18 ; L4.1@4055.12,4301.18 4031.5,4301.18
NetD1_3: D1.3 R2.2 | length 55.3
  Top Layer w7.87: D1.3@4171.26,6250 4181.1,6259.84 R2.2@4222.44,6259.84